# Allegro board Greybull_osp.brd

Outline 288 x 245 mm; copper layers: TOP, LYR2, LYR3, LYR4, LYR5, BOTTOM. Coordinates in mm from the lower left corner of the outline.
Outline path: 0,170.46 0,6 arc(1.76,1.76) 6,0 282,0 arc(286.24,1.76) 288,6 288,239 arc(286.24,243.24) 282,245 63.48,245 arc(61.43,244.64) 59.63,243.6 48.67,234.4 arc(46.87,233.36) 44.82,233 14,233 arc(6.93,230.07) 4,223 4,180.61 arc(3.8,179.05) 3.2,177.61 0.8,173.46 arc(0.2,172.02) 0,170.46

## Design rules (mm)
constraint set DEFAULT: min track width 0.102
net group 250M_BYPASS: nets 250M_CLK_BYPASS_DN 250M_CLK_BYPASS_DP
net group AV_SOC_100M_CLK: nets SOC_AV_NS_100M_CLKN SOC_AV_NS_100M_CLKP
net group BINDSW_N: nets BINDSW_N BINDSW_N_R
net group BKUP_SB_AV_CLK: nets BKUP_SB_AV_CLKN BKUP_SB_AV_CLKP
net group BKUP_SB_PEX_REF_CLK: nets BKUP_SB_PEX_REF_CLKN BKUP_SB_PEX_REF_CLKP
net group BKUP_SB_SYNC_CLK: nets BKUP_SB_SYNC_CLKN BKUP_SB_SYNC_CLKP
net group BLEEDER_V12P0_B2: nets BLEEDER_V12P0_B2 BLEEDER_V12P0_C2
net group CRYSTAL-DIFFPAIR1: nets SMC_XTAL_IN SMC_XTAL_OUT_R
net group DDA_LFC: nets DDA_LFC DDA_LFCSENSE
net group DP1-USB3-FP-P-T-CM: nets USB3_FP_P0_TN_CMC USB3_FP_P0_TP_CMC
net group DP1_USB3_AUX_T_CM: nets USB3_AUX_TN_CMC USB3_AUX_TP_CMC
net group DP2_USB3_FP_P0_RN_C: nets USB3_FP_P0_RN USB3_FP_P0_RP
net group DP_BKUP_ENET_PEX_REF_CLKN_R: nets ENET_PEX_SS_100M_CLKN ENET_PEX_SS_100M_CLKP
net group DP_L0_SB_SOC_TN: nets DP_L0_SB_SOC_TN DP_L0_SB_SOC_TN_C
net group DP_L0_SB_SOC_TP: nets DP_L0_SB_SOC_TP DP_L0_SB_SOC_TP_C
net group DP_L1_SB_SOC_TN: nets DP_L1_SB_SOC_TN DP_L1_SB_SOC_TN_C
net group DP_L1_SB_SOC_TP: nets DP_L1_SB_SOC_TP DP_L1_SB_SOC_TP_C
net group DP_USB3_AUX_R_C: nets USB3_AUX_RN USB3_AUX_RP
net group DP_USB3_TP_P0_RN_C: nets USB3_TP_P1_RN USB3_TP_P1_RP
net group ENET_EEDO: nets ENET_EEDO ENET_LED3
net group ENET_EESK: nets ENET_EESK ENET_LED1
net group ENET_LED0: nets ENET_LED0 ENET_LED0_R
net group FAN_PWM: nets FAN_PWM FAN_PWM_R
net group FTDI_SMC_CTS: nets FTDI_SMC_CTS SMC_CTS
net group FTDI_SMC_RTS: nets FTDI_SMC_RTS SMC_RTS
net group HDD_PWR_EN: nets HDD_PWR_EN HDD_PWR_EN_R
net group HDMI_DP_OUT_SEL: nets HDMI_DP_OUT_SEL SMM_GPIO1
net group HDMI_HPD_PIN: nets HDMI_HPD_PIN HDMI_RX_HPD
net group HDMI_RX_TEST: nets HDMI_RX_TESTN HMDI_RX_TESTP
net group HDMI_TX_HPD_G: nets HDMI_TX_HPD_G HDMI_TX_HPD_PIN
net group HDT_TRST: nets HDT_TRST TRST_L
net group IR_BLAST_E1: nets IR_BLAST_E1 IR_BLAST_G2
net group IR_BLAST_EN: nets IR_BLAST_EN SMC_P1_GPIO1
net group IR_BLAST_SLEEVE: nets IR_BLAST_SLEEVE IR_BLAST_TIP
net group IR_BLAST_XIN: nets IR_BLAST_XIN IR_BLAST_XOUT
net group KER_DBG_RTS: nets KER_DBG_RTS KER_DBG_RTS_FACET
net group KER_DBG_TXD: nets KER_DBG_TXD KER_DBG_TXD_FACET
net group KIC3P3HDMI_B: nets KIC3P3HDMI_B KIC3P3HDMI_G
net group MA_VREFDQ: nets MA_VREFDQ MA_VREFDQ_MM
net group MB_VREFDQ: nets MB_VREFDQ MB_VREFDQ_MM
net group MC_VREFDQ: nets MC_VREFDQ MC_VREFDQ_MM
net group MD_VREFDQ: nets MD_VREFDQ MD_VREFDQ_MM
net group MMC_CLK: nets MMC_CLK MMC_CLK_R
net group MMC_CMD: nets MMC_CMD MMC_CMD_R
net group MMC_DATA<0>: nets MMC_DATA<0> MMC_DATA_R<0>
net group MMC_DATA<1>: nets MMC_DATA<1> MMC_DATA_R<1>
net group MMC_DATA<2>: nets MMC_DATA<2> MMC_DATA_R<2>
net group MMC_DATA<3>: nets MMC_DATA<3> MMC_DATA_R<3>
net group MMC_DATA<4>: nets MMC_DATA<4> MMC_DATA_R<4>
net group MMC_DATA<5>: nets MMC_DATA<5> MMC_DATA_R<5>
net group MMC_DATA<6>: nets MMC_DATA<6> MMC_DATA_R<6>
net group MMC_DATA<7>: nets MMC_DATA<7> MMC_DATA_R<7>
net group MMC_RST_N: nets MMC_RST_N MMC_RST_N_R
net group ODD_PWR_EN: nets ODD_PWR_EN ODD_PWR_EN_R
net group ODD_STATUS: nets ODD_STATUS ODD_STATUS_R
net group PEX-SOC-M1: nets PEX_SOC_SPARE_TN PEX_SOC_SPARE_TP
net group PEX-SPARE-M1: nets PEX_SPARE_SOC_TN_C PEX_SPARE_SOC_TP_C
net group PEX_ENET_SOC_TN: nets PEX_ENET_SOC_TN PEX_ENET_SOC_TN_C
net group PEX_ENET_SOC_TP: nets PEX_ENET_SOC_TP PEX_ENET_SOC_TP_C
net group PEX_L0_SB_SOC_TN: nets PEX_L0_SB_SOC_TN PEX_L0_SB_SOC_TN_C
net group PEX_L0_SB_SOC_TP: nets PEX_L0_SB_SOC_TP PEX_L0_SB_SOC_TP_C
net group PEX_L0_SOC_SB_TN: nets PEX_L0_SOC_SB_TN PEX_L0_SOC_SB_TN_C
net group PEX_L0_SOC_SB_TP: nets PEX_L0_SOC_SB_TP PEX_L0_SOC_SB_TP_C
net group PEX_L1_SB_SOC_TN: nets PEX_L1_SB_SOC_TN PEX_L1_SB_SOC_TN_C
net group PEX_L1_SB_SOC_TP: nets PEX_L1_SB_SOC_TP PEX_L1_SB_SOC_TP_C
net group PEX_L1_SOC_SB_TN: nets PEX_L1_SOC_SB_TN PEX_L1_SOC_SB_TN_C
net group PEX_L1_SOC_SB_TP: nets PEX_L1_SOC_SB_TP PEX_L1_SOC_SB_TP_C
net group PEX_SOC_100M_CLK: nets SOC_PEX_SS_100M_CLKN SOC_PEX_SS_100M_CLKP
net group PEX_SOC_ENET_TN: nets PEX_SOC_ENET_TN PEX_SOC_ENET_TN_C
net group PEX_SOC_ENET_TP: nets PEX_SOC_ENET_TP PEX_SOC_ENET_TP_C
net group PEX_XTAL1: nets PEX_XTAL1 PEX_XTAL_1_R
net group SATA0_ODD_RN: nets SATA0_ODD_RN SATA0_ODD_RN_C
net group SATA0_ODD_RP: nets SATA0_ODD_RP SATA0_ODD_RP_C
net group SATA0_ODD_TN: nets SATA0_ODD_TN SATA0_ODD_TN_C
net group SATA0_ODD_TP: nets SATA0_ODD_TP SATA0_ODD_TP_C
net group SATA1_HDD_RN: nets SATA1_HDD_RN SATA1_HDD_RN_C
net group SATA1_HDD_RP: nets SATA1_HDD_RP SATA1_HDD_RP_C
net group SATA1_HDD_TN: nets SATA1_HDD_TN SATA1_HDD_TN_C
net group SATA1_HDD_TP: nets SATA1_HDD_TP SATA1_HDD_TP_C
net group SB_TDO: nets SB_TDO SB_TDO_FACET
net group SMC_BYPASS: nets TEST25_N TEST25_P
net group SMC_DBG_LED0_SWO: nets SMC_DBG_LED0_SWO SMC_DBG_LED0_SWO_FACET
net group SMC_P1_GPIO2: nets SMC_P1_GPIO2 USB_AUX_EN
net group SOC_NB_PEX_SS_100M_CLK: nets SOC_NB_PEX_SS_100M_CLKN SOC_NB_PEX_SS_100M_CLKP
net group SOC_PWR_OK: nets SOC_PWR_OK SOC_PWR_OK_R
net group SOC_REF_NS_100M_CLK: nets SOC_REF_NS_100M_CLKN SOC_REF_NS_100M_CLKP
net group SOC_RESET_N_R: nets SOC_RESET_N_R SOC_RST_N
net group SOC_THERMTRIP: nets SOC_THERMTRIP SOC_THERMTRIP_R
net group SP_SMC_INT_N: nets SP_SMC_INT_N SP_SMC_INT_N_R
net group SVC: nets SVC SVC_R
net group SVD: nets SVD SVD_R
net group SVT: nets SVT SVT_R
net group TMDS_TX_CLKN: nets TMDS_TX_CLKN TMDS_TX_CLKN_C
net group TMDS_TX_CLKP: nets TMDS_TX_CLKP TMDS_TX_CLKP_C
net group TMDS_TX_DN0: nets TMDS_TX_DN0 TMDS_TX_DN0_C
net group TMDS_TX_DN1: nets TMDS_TX_DN1 TMDS_TX_DN1_C
net group TMDS_TX_DN2: nets TMDS_TX_DN2 TMDS_TX_DN2_C
net group TMDS_TX_DP0: nets TMDS_TX_DP0 TMDS_TX_DP0_C
net group TMDS_TX_DP1: nets TMDS_TX_DP1 TMDS_TX_DP1_C
net group TMDS_TX_DP2: nets TMDS_TX_DP2 TMDS_TX_DP2_C
net group USB2-TX-RX-M1: nets USB2_BP_P1_DN USB2_BP_P1_DP
net group USB2_ACC: nets USB2_ACC_DN USB2_ACC_DP
net group USB2_AUX: nets USB2_AUX_DN USB2_AUX_DP
net group USB2_WIFI: nets USB2_WIFI_DN USB2_WIFI_DP
net group USB3-TX-RX-M1: nets USB2_BP_P0_DN USB2_BP_P0_DP
net group USB3_AUX_TN: nets USB3_AUX_TN USB3_AUX_TN_C
net group USB3_AUX_TP: nets USB3_AUX_TP USB3_AUX_TP_C
net group USB3_BP_P0_TN: nets USB3_BP_P0_TN USB3_BP_P0_TN_C
net group USB3_BP_P0_TP: nets USB3_BP_P0_TP USB3_BP_P0_TP_C
net group USB3_BP_P1_TN: nets USB3_BP_P1_TN USB3_BP_P1_TN_C
net group USB3_BP_P1_TP: nets USB3_BP_P1_TP USB3_BP_P1_TP_C
net group USB3_FP_P0_TN: nets USB3_FP_P0_TN USB3_FP_P0_TN_C
net group USB3_FP_P0_TP: nets USB3_FP_P0_TP USB3_FP_P0_TP_C
net group USB3_TP_P1_TN: nets USB3_TP_P1_TN USB3_TP_P1_TN_C
net group USB3_TP_P1_TP: nets USB3_TP_P1_TP USB3_TP_P1_TP_C
net group USB_AUX_EN_D: nets USB_AUX_EN_D USB_AUX_OCP_EN_N
net group VREG_3P3STBY_IN_SEL_C: nets VREG_3P3STBY_IN_SEL_C VREG_3P3STBY_IN_SEL_PGATE
net group VREG_BURN_EN: nets VREG_BURN_EN VREG_BURN_EN_R
net group VREG_BURN_OUT_CGD: nets VREG_BURN_OUT_CGD VREG_BURN_OUT_G
net group VREG_MEMCORE_VID0: nets VREG_MEMCORE_VID0 VREG_MEMCORE_VID0_R
net group VREG_MEMCORE_VID1: nets VREG_MEMCORE_VID1 VREG_MEMCORE_VID1_R
net group VREG_V3P3_FB: nets VREG_V3P3_FB VREG_V3P3_VO
net group VREG_VTTA_VO: nets VREG_VTTA_VO VREG_VTTA_VO_R
net group VREG_VTTB_VO: nets VREG_VTTB_VO VREG_VTTB_VO_R
net group VREG_VTTC_VO: nets VREG_VTTC_VO VREG_VTTC_VO_R
net group VREG_VTTD_VO: nets VREG_VTTD_VO VREG_VTTD_VO_R
net group BLEEDER_B: nets BLEEDER_B SMC_RST_N SMC_RST_N_FACET SMC_RST_N_OUT_R
net group BLEEDER_V12P0_B1: nets BLEEDER_V12P0_B1 PSU_V12P0_EN PSU_V12P0_EN_R V12P0_PWRGD
net group DP_AUX_SB_SOC_TN: nets DP_AUX_SB_SOC_TN DP_AUX_SB_SOC_TN_C DP_AUX_SOC_SB_TN
net group DP_AUX_SB_SOC_TP: nets DP_AUX_SB_SOC_TP DP_AUX_SB_SOC_TP_C DP_AUX_SOC_SB_TP
net group EJECTSW_N: nets EJECTSW_N EJECTSW_N_R EJECTSW_N_SW
net group ENET-DIFFPAIR-M1: nets MDIN0 MDIN1 MDIN2 MDIN3 MDIP0 MDIP1 MDIP2 MDIP3
net group ENET_REF_CLK: nets ENET_REF_CLK PEX_XTAL2 PEX_XTAL_2_R
net group FAN_TACH_IN: nets FAN_TACH_IN FAN_TACH_IN_R SMM_GPIO0
net group HDMI-RX-D-DIFFPAIR-M1: nets TMDS_RX_CLKN TMDS_RX_DN0 TMDS_RX_DN1 TMDS_RX_DN2 TMDS_RX_DP0 TMDS_RX_DP1 TMDS_RX_DP2
net group HDMI_OUT_DDC_BUFF_CLK: nets HDMI_OUT_DDC_BUFF_CLK HDMI_OUT_DDC_CLK HDMI_OUT_DDC_CLK_R HDMI_TX_DDC_CLK HDMI_TX_DDC_CLK_SB
net group HDMI_OUT_DDC_BUFF_DATA: nets HDMI_OUT_DDC_BUFF_DATA HDMI_OUT_DDC_DATA HDMI_OUT_DDC_DATA_R HDMI_TX_DDC_DATA HDMI_TX_DDC_DATA_SB
net group HDMI_RX_CEC: nets HDMI_RX_CEC HDMI_RX_CEC_3P3 HDMI_RX_CEC_R HDMI_TX_CEC
net group HDMI_RX_DDC_5V: nets HDMI_RX_DDC_5V HDMI_RX_DDC_5V_G HDMI_RX_DDC_CLK HDMI_RX_DDC_CLK_SB HDMI_RX_DDC_DATA HDMI_RX_DDC_DATA_SB
net group HDMI_RX_DDC_5V_D: nets HDMI_RX_DDC_5V_D HDMI_RX_DDC_5V_E HDMI_RX_DDC_5V_E_R
net group IR_BLAST_G1: nets IR_BLAST_G1 IR_BLAST_LED IR_BLAST_OR_OUT IR_BLAST_P0_6 IR_BLAST_P0_7 IR_BLAST_P3_1_IN IR_BLAST_P3_1_OUT IR_BLAST_P3_1_R IR_BLAST_RXD IR_BLAST_SENSOR_SIG IR_BLAST_SMC_OUT_C SMC_TXD V_3P3STBY_IR
net group IR_BLAST_P1_5: nets IR_BLAST_P1_5 IR_BLAST_TXD SMC_RXD
net group IR_BLAST_SMC_OUT: nets IR_BLAST_SMC_OUT IR_BLAST_SMC_OUT_B SMC_P3_GPIO7
net group KIC3P3HDMI_C: nets KIC3P3HDMI_C
net group MA_A: nets MA_A<0> MA_A<1> MA_A<2> MA_A<3> MA_A<4> MA_A<5> MA_A<6> MA_A<7> MA_A<8> MA_A<9> MA_A<10> MA_A<11> MA_A<12> MA_A<13> MA_A<14> MA_A<15>
net group MA_BA: nets MA_BA<0> MA_BA<1> MA_BA<2>
net group MB_A: nets MB_A<0> MB_A<1> MB_A<2> MB_A<3> MB_A<4> MB_A<5> MB_A<6> MB_A<7> MB_A<8> MB_A<9> MB_A<10> MB_A<11> MB_A<12> MB_A<13> MB_A<14> MB_A<15>
net group MB_BA: nets MB_BA<0> MB_BA<1> MB_BA<2>
net group MC_A: nets MC_A<0> MC_A<1> MC_A<2> MC_A<3> MC_A<4> MC_A<5> MC_A<6> MC_A<7> MC_A<8> MC_A<9> MC_A<10> MC_A<11> MC_A<12> MC_A<13> MC_A<14> MC_A<15>
net group MC_BA: nets MC_BA<0> MC_BA<1> MC_BA<2>
net group MD_A: nets MD_A<0> MD_A<1> MD_A<2> MD_A<3> MD_A<4> MD_A<5> MD_A<6> MD_A<7> MD_A<8> MD_A<9> MD_A<10> MD_A<11> MD_A<12> MD_A<13> MD_A<14> MD_A<15>
net group MD_BA: nets MD_BA<0> MD_BA<1> MD_BA<2>
net group MEM-A-ADDR-CLK2STROBE-M1: nets MD_DQSL_0_P MD_DQSL_1_P MD_DQSL_2_P MD_DQSL_3_P MD_DQSU_0_P MD_DQSU_1_P MD_DQSU_2_P MD_DQSU_3_P
net group MEM-B-ADDR-CLK2STROBE-M1: nets MC_DQSL_0_P MC_DQSL_1_P MC_DQSL_2_P MC_DQSL_3_P MC_DQSU_0_P MC_DQSU_1_P MC_DQSU_2_P MC_DQSU_3_P
net group MEM-C-ADDR-CLK2STROBE-M1: nets MB_DQSL_0_P MB_DQSL_1_P MB_DQSL_2_P MB_DQSL_3_P MB_DQSU_0_P MB_DQSU_1_P MB_DQSU_2_P MB_DQSU_3_P
net group MEM-D-ADDR-CLK2STROBE-M1: nets MA_DQSL_0_P MA_DQSL_1_P MA_DQSL_2_P MA_DQSL_3_P MA_DQSU_0_P MA_DQSU_1_P MA_DQSU_2_P MA_DQSU_3_P
net group MEM-DATA-A_0-7-M1: nets MD_DML_0 MD_DQ0 MD_DQ1 MD_DQ2 MD_DQ3 MD_DQ4 MD_DQ5 MD_DQ6 MD_DQ7 MD_DQSL_0_N
net group MEM-DATA-A_8-15-M1: nets MD_DMU_0 MD_DQ8 MD_DQ9 MD_DQ10 MD_DQ11 MD_DQ12 MD_DQ13 MD_DQ14 MD_DQ15 MD_DQSU_0_N
net group MEM-DATA-A_16-23-M1: nets MD_DML_1 MD_DQ16 MD_DQ17 MD_DQ18 MD_DQ19 MD_DQ20 MD_DQ21 MD_DQ22 MD_DQ23 MD_DQSL_1_N
net group MEM-DATA-A_24-31-M1: nets MD_DMU_1 MD_DQ24 MD_DQ25 MD_DQ26 MD_DQ27 MD_DQ28 MD_DQ29 MD_DQ30 MD_DQ31 MD_DQSU_1_N
net group MEM-DATA-A_32-39-M1: nets MD_DML_2 MD_DQ32 MD_DQ33 MD_DQ34 MD_DQ35 MD_DQ36 MD_DQ37 MD_DQ38 MD_DQ39 MD_DQSL_2_N
net group MEM-DATA-A_40-47-M1: nets MD_DMU_2 MD_DQ40 MD_DQ41 MD_DQ42 MD_DQ43 MD_DQ44 MD_DQ45 MD_DQ46 MD_DQ47 MD_DQSU_2_N
net group MEM-DATA-A_48-55-M1: nets MD_DML_3 MD_DQ48 MD_DQ49 MD_DQ50 MD_DQ51 MD_DQ52 MD_DQ53 MD_DQ54 MD_DQ55 MD_DQSL_3_N
net group MEM-DATA-A_56-63-M1: nets MD_DMU_3 MD_DQ56 MD_DQ57 MD_DQ58 MD_DQ59 MD_DQ60 MD_DQ61 MD_DQ62 MD_DQ63 MD_DQSU_3_N
net group MEM-DATA-B_0-7-M1: nets MC_DML_0 MC_DQ0 MC_DQ1 MC_DQ2 MC_DQ3 MC_DQ4 MC_DQ5 MC_DQ6 MC_DQ7 MC_DQSL_0_N
net group MEM-DATA-B_8-15-M1: nets MC_DMU_0 MC_DQ8 MC_DQ9 MC_DQ10 MC_DQ11 MC_DQ12 MC_DQ13 MC_DQ14 MC_DQ15 MC_DQSU_0_N
net group MEM-DATA-B_16-23-M1: nets MC_DML_1 MC_DQ16 MC_DQ17 MC_DQ18 MC_DQ19 MC_DQ20 MC_DQ21 MC_DQ22 MC_DQ23 MC_DQSL_1_N
net group MEM-DATA-B_24-31-M1: nets MC_DMU_1 MC_DQ24 MC_DQ25 MC_DQ26 MC_DQ27 MC_DQ28 MC_DQ29 MC_DQ30 MC_DQ31 MC_DQSU_1_N
net group MEM-DATA-B_32-39-M1: nets MC_DML_2 MC_DQ32 MC_DQ33 MC_DQ34 MC_DQ35 MC_DQ36 MC_DQ37 MC_DQ38 MC_DQ39 MC_DQSL_2_N
net group MEM-DATA-B_40-47-M1: nets MC_DMU_2 MC_DQ40 MC_DQ41 MC_DQ42 MC_DQ43 MC_DQ44 MC_DQ45 MC_DQ46 MC_DQ47 MC_DQSU_2_N
net group MEM-DATA-B_48-55-M1: nets MC_DML_3 MC_DQ48 MC_DQ49 MC_DQ50 MC_DQ51 MC_DQ52 MC_DQ53 MC_DQ54 MC_DQ55 MC_DQSL_3_N
net group MEM-DATA-B_56-63-M1: nets MC_DMU_3 MC_DQ56 MC_DQ57 MC_DQ58 MC_DQ59 MC_DQ60 MC_DQ61 MC_DQ62 MC_DQ63 MC_DQSU_3_N
net group MEM-DATA-C_0-7-M1: nets MB_DML_0 MB_DQ0 MB_DQ1 MB_DQ2 MB_DQ3 MB_DQ4 MB_DQ5 MB_DQ6 MB_DQ7 MB_DQSL_0_N
net group MEM-DATA-C_8-15-M1: nets MB_DMU_0 MB_DQ8 MB_DQ9 MB_DQ10 MB_DQ11 MB_DQ12 MB_DQ13 MB_DQ14 MB_DQ15 MB_DQSU_0_N
net group MEM-DATA-C_16-23-M1: nets MB_DML_1 MB_DQ16 MB_DQ17 MB_DQ18 MB_DQ19 MB_DQ20 MB_DQ21 MB_DQ22 MB_DQ23 MB_DQSL_1_N
net group MEM-DATA-C_24-31-M1: nets MB_DMU_1 MB_DQ24 MB_DQ25 MB_DQ26 MB_DQ27 MB_DQ28 MB_DQ29 MB_DQ30 MB_DQ31
net group MEM-DATA-C_32-39-M1: nets MB_DML_2 MB_DQ32 MB_DQ33 MB_DQ34 MB_DQ35 MB_DQ36 MB_DQ37 MB_DQ38 MB_DQ39 MB_DQSL_2_N
net group MEM-DATA-C_40-47-M1: nets MB_DMU_2 MB_DQ40 MB_DQ41 MB_DQ42 MB_DQ43 MB_DQ44 MB_DQ45 MB_DQ46 MB_DQ47 MB_DQSU_2_N
net group MEM-DATA-C_48-55-M1: nets MB_DML_3 MB_DQ48 MB_DQ49 MB_DQ50 MB_DQ51 MB_DQ52 MB_DQ53 MB_DQ54 MB_DQ55 MB_DQSL_3_N
net group MEM-DATA-C_56-63-M1: nets MB_DMU_3 MB_DQ56 MB_DQ57 MB_DQ58 MB_DQ59 MB_DQ60 MB_DQ61 MB_DQ62 MB_DQ63 MB_DQSU_3_N
net group MEM-DATA-D_0-7-M1: nets MA_DML_0 MA_DQ0 MA_DQ1 MA_DQ2 MA_DQ3 MA_DQ4 MA_DQ5 MA_DQ6 MA_DQ7 MA_DQSL_0_N
net group MEM-DATA-D_8-15-M1: nets MA_DMU_0 MA_DQ8 MA_DQ9 MA_DQ10 MA_DQ11 MA_DQ12 MA_DQ13 MA_DQ14 MA_DQ15 MA_DQSU_0_N
net group MEM-DATA-D_16-23-M1: nets MA_DML_1 MA_DQ16 MA_DQ17 MA_DQ18 MA_DQ19 MA_DQ20 MA_DQ21 MA_DQ22 MA_DQ23 MA_DQSL_1_N
net group MEM-DATA-D_24-31-M1: nets MA_DMU_1 MA_DQ24 MA_DQ25 MA_DQ26 MA_DQ27 MA_DQ28 MA_DQ29 MA_DQ30 MA_DQ31 MA_DQSU_1_N
net group MEM-DATA-D_32-39-M1: nets MA_DML_2 MA_DQ32 MA_DQ33 MA_DQ34 MA_DQ35 MA_DQ36 MA_DQ37 MA_DQ38 MA_DQ39 MA_DQSL_2_N
net group MEM-DATA-D_40-47-M1: nets MA_DMU_2 MA_DQ40 MA_DQ41 MA_DQ42 MA_DQ43 MA_DQ44 MA_DQ45 MA_DQ46 MA_DQ47 MA_DQSU_2_N
net group MEM-DATA-D_48-55-M1: nets MA_DML_3 MA_DQ48 MA_DQ49 MA_DQ50 MA_DQ51 MA_DQ52 MA_DQ53 MA_DQ54 MA_DQ55 MA_DQSL_3_N
net group MEM-DATA-D_56-63-M1: nets MA_DMU_3 MA_DQ56 MA_DQ57 MA_DQ58 MA_DQ59 MA_DQ60 MA_DQ61 MA_DQ62 MA_DQ63 MA_DQSU_3_N
net group MEM_A_ADDR: nets MD_CKE0 MD_CS0_N MD_ODT0 MD_RESET_N
net group PWRSW_N: nets PWRSW_N PWRSW_N_R PWRSW_N_SW
net group RTC_CLK_OUT: nets RTC_CLK_OUT X32K_X1 X32K_X1_R X32K_X2
net group SB_SOC_CLK: nets SB_SOC_CLK SB_SOC_CLK_R SIC
net group SB_SOC_DATA: nets SB_SOC_DATA SB_SOC_DATA_R SID
net group SMBUS_CLK: nets SMBUS_CLK SMBUS_CLK_CPUCORE SMBUS_CLK_FACET SMBUS_CLK_R
net group SMBUS_DATA: nets SMBUS_DATA SMBUS_DATA_CPUCORE SMBUS_DATA_FACET SMBUS_DATA_R
net group SPI_MISO: nets SPI_MISO SPI_MISO_FACET SPI_MISO_R
net group TMDS_RX_CLK: nets TMDS_RX_CLKP
net group USB3-AUX2-M1: nets USB3_BP_P0_RN USB3_BP_P0_RP USB3_BP_P1_RN USB3_BP_P1_RP
net group USB3-BP-CM-M1: nets USB3_BP_P0_TN_CMC USB3_BP_P0_TP_CMC USB3_BP_P1_TN_CMC USB3_BP_P1_TP_CMC
net group VREG_1P1STBY_AGND: nets VREG_1P1STBY_AGND VREG_1P1STBY_COMP VREG_1P1STBY_COMP_C VREG_1P1STBY_FB VREG_1P1STBY_FB_TOP
net group VREG_1P1STBY_PWRGD: nets VREG_1P1STBY_PWRGD VREG_1P8STBY_EN VREG_1P8STBY_IN VREG_1P8STBY_IN_D1 VREG_1P8STBY_IN_D2 VREG_1P8STBY_IN_D3
net group VREG_3P3STBY_AGND: nets VREG_3P3STBY_AGND VREG_3P3STBY_COMP VREG_3P3STBY_COMP_C VREG_3P3STBY_FB VREG_3P3STBY_FB_TOP
net group VREG_3P3STBY_EN: nets V_VREG_STBY_VIN_CR VREG_3P3STBY_EN VREG_3P3STBY_PWRGD
net group VREG_3P3STBY_IN_SEL: nets VREG_3P3STBY_IN_SEL VREG_3P3STBY_IN_SEL_B1 VREG_3P3STBY_IN_SEL_B2
net group VREG_5P0_ADDR: nets VREG_5P0_ADDR VREG_5P0_LDO5 VREG_V5P0_PWRGD
net group VREG_CPUCORE_COMP: nets VREG_CPUCORE_COMP VREG_CPUCORE_COMP_R VREG_CPUCORE_DIFFOUT VREG_CPUCORE_FB VREG_CPUCORE_FB_C VREG_CPUCORE_TRBST VREG_CPUCORE_TRBST_R VREG_VDD_TRBST_C
net group VREG_CPUCORE_CSCOMP: nets VREG_CPUCORE_CSCOMP VREG_CPUCORE_CSCOMP_R VREG_CPUCORE_CSN VREG_CPUCORE_CSN_R VREG_CPUCORE_CSP VREG_CPUCORE_CSSUM VREG_CPUCORE_DROOP VREG_CPUCORE_ILIM VREG_CPUCORE_SW_S
net group VREG_CPUCORE_PH_EN: nets VREG_CPUCORE_PH_EN VREG_GFXCORE_PH1_EN VREG_GFXCORE_PH2_EN VREG_GFXCORE_PH3_EN VREG_GFXCORE_PH4_EN VREG_GFXCPU_DRV_EN
net group VREG_GFXCORE_COMP: nets VREG_GFXCORE_COMP VREG_GFXCORE_COMP_R VREG_GFXCORE_DIFFOUT VREG_GFXCORE_FB VREG_GFXCORE_FB_C VREG_GFXCORE_TRBST VREG_GFXCORE_TRBST_C VREG_GFXCORE_TRBST_R
net group VREG_GFXCORE_CSCOMP: nets VREG_GFXCORE_CSCOMP VREG_GFXCORE_CSCOMP_R VREG_GFXCORE_CSSUM VREG_GFXCORE_DROOP VREG_GFXCORE_ILIM
net group VREG_GFXCORE_CSN1: nets VREG_GFXCORE_CSN1 VREG_GFXCORE_CSN2 VREG_GFXCORE_CSN3 VREG_GFXCORE_CSN4 VREG_GFXCORE_CSP1 VREG_GFXCORE_CSP2 VREG_GFXCORE_CSP3 VREG_GFXCORE_CSP4 VREG_GFXCORE_CSREF
net group VREG_MEMCORE_COMP: nets VREG_MEMCORE_COMP VREG_MEMCORE_FB VREG_MEMCORE_FB_R VREG_MEMCORE_RNT_R VREG_MEMCORE_S
net group VREG_MEMCORE_CSN: nets VREG_MEMCORE_CSN VREG_MEMCORE_CSP VREG_MEMCORE_SW_S
net group VREG_MEMCORE_RTN: nets VREG_MEMCORE_RTN VREG_MEMCORE_SET0 VREG_MEMCORE_SET1 VREG_MEMCORE_SET2 VREG_MEMCORE_SS
net group VREG_MEMIOAB_FB: nets VREG_MEMIOAB_FB VREG_MEMIOAB_FB_R_GND VREG_MEMIOAB_VO
net group VREG_MEMIOCD_FB: nets VREG_MEMIOCD_FB VREG_MEMIOCD_FB_R_GND VREG_MEMIOCD_VO
net group VREG_NBCORE_FB: nets VREG_NBCORE_FB VREG_NBCORE_VO VREG_NPCORE_FB_R_GND
net group VREG_SB1P1_EN: nets V_SB2P5 VREG_SB1P1_EN VREG_SB1P8_EN
net group VREG_SB2P5_COMP_C: nets VREG_SB2P5_COMP_C VREG_SB2P5_FB VREG_SB2P5_TOP
net group VREG_SOCPHY_COMP_C: nets VREG_SOCPHY_COMP_C VREG_SOCPHY_FB VREG_SOCPHY_FB_TOP
net group VREG_V5P0_DUAL_SEL0: nets VREG_V5P0_DUAL_SEL0 VREG_V5P0_SEL_B1 VREG_V5P0_SEL_B2
net group VREG_V5P0DUAL_CDG: nets VREG_V5P0_SEL_C VREG_V5P0_SEL_PGATE VREG_V5P0DUAL_CDG
net group ZQ: nets MA_ZQ0 MA_ZQ1 MA_ZQ2 MA_ZQ3 MB_ZQ0 MB_ZQ1 MB_ZQ2 MB_ZQ3 MC_ZQ0 MC_ZQ1 MC_ZQ2 MC_ZQ3 MD_ZQ0 MD_ZQ1 MD_ZQ2 MD_ZQ3
net group ZVDDIO: nets MA_ZVDDIO MB_ZVDDIO MC_ZVDDIO MD_ZVDDIO

## Placement (name value [footprint] x y rotation side)
C1N1  -  [CAP_0402_CO]  247.32 220.65 270 bottom
C1N2  -  [CAP_0603_CO]  264.46 216.46 90 bottom
C1N3  -  [CAP_0603_CO]  262.94 216.46 90 bottom
C1N4  -  [CAP_0603_CO]  261.41 216.46 90 bottom
C1N5  -  [CAP_0603_CO]  259.89 216.46 90 bottom
C1P3  -  [CAP_0402_CO]  278.05 166.8 270 bottom
C1P4  -  [CAP_0402_CO]  279.45 165.53 90 bottom
C1P5  -  [CAP_0402_CO]  256.62 165.14 90 bottom
C1P6  -  [CAP_0402_CO]  278.05 164.26 270 bottom
C1P7  -  [CAP_0603_CO]  270.05 162.35 0 bottom
C1P8  -  [CAP_0402_CO]  277.67 161.72 270 bottom
C1P9  -  [CAP_0402_CO]  263.7 158.8 270 bottom
C1P10  -  [CAP_0402_CO]  276.02 158.42 270 bottom
C1P11  -  [CAP_0402_CO]  247.2 157.98 90 bottom
C1P12  -  [CAP_0402_CO]  254.56 157.34 90 bottom
C1P13  -  [CAP_0402_CO]  256.21 157.34 270 bottom
C1P14  -  [CAP_0402_CO]  258.37 156.71 270 bottom
C1P15  -  [CAP_0402_CO]  276.78 156.64 0 bottom
C1P16  -  [CAP_0402_CO]  247.2 155.56 270 bottom
C1P17  -  [CAP_0402_CO]  248.97 155.56 90 bottom
C1P18  -  [CAP_0402_CO]  254.56 154.8 90 bottom
C1P19  -  [CAP_0402_CO]  250.62 152.83 180 bottom
C1R1  -  [CAP_0805_CO]  276.27 141.65 0 bottom
C1R2  -  [CAP_0805_CO]  276.27 139.11 0 bottom
C1R3  -  [CAP_0805_CO]  276.27 127.68 0 bottom
C1R4  -  [CAP_0805_CO]  276.27 125.27 0 bottom
C1R5  -  [CAP_0805_CO]  276.27 113.71 0 bottom
C1R6  -  [CAP_0805_CO]  276.27 111.17 0 bottom
C1T1  -  [CAP_0805_CO]  276.27 99.74 0 bottom
C1T2  -  [CAP_0805_CO]  276.27 97.2 0 bottom
C1T3  -  [CAP_0805_CO]  276.27 85.77 0 bottom
C1T4  -  [CAP_0805_CO]  276.27 83.23 0 bottom
C1U2  -  [CAP_0805_CO]  279.32 51.1 270 bottom
C1U3  -  [CAP_0805_CO]  281.23 51.1 270 bottom
C1U4  -  [CAP_0402_CO]  251.51 39.92 90 bottom
C1U5  -  [CAP_0402_CO]  248.97 37.2 270 bottom
C1U6  -  [CAP_0402_CO]  254.56 36.44 270 bottom
C1U7  -  [CAP_0402_CO]  256.34 36.44 90 bottom
C1U8  -  [CAP_0402_CO]  247.32 34.66 90 bottom
C1U9  -  [CAP_0402_CO]  248.97 34.66 270 bottom
C1U10  -  [CAP_0402_CO]  256.34 34.02 270 bottom
C1U11  -  [CAP_0402_CO]  247.07 26.91 270 bottom
C1U12  -  [CAP_0402_CO]  256.85 26.28 0 bottom
C2N1  -  [CAP_0402_CO]  229.41 224.2 270 bottom
C2P3  -  [CAP_0402_CO]  246.55 165.4 180 bottom
C2P4  -  [CAP_0402_CO]  231.62 165.35 180 bottom
C2P5  -  [CAP_0402_CO]  216.21 165.34 180 bottom
C2P6  -  [CAP_0402_CO]  210.75 165.09 90 bottom
C2P7  -  [CAP_0402_CO]  225.99 165.09 90 bottom
C2P8  -  [CAP_0402_CO]  241.38 164.63 90 bottom
C2P9  -  [CAP_0402_CO]  233.6 157.98 90 bottom
C2P10  -  [CAP_0402_CO]  218.35 157.98 90 bottom
C2P11  -  [CAP_0402_CO]  239.34 157.48 90 bottom
C2P12  -  [CAP_0402_CO]  208.84 157.47 90 bottom
C2P13  -  [CAP_0402_CO]  224.08 157.47 90 bottom
C2P14  -  [CAP_0402_CO]  212.65 156.71 270 bottom
C2P15  -  [CAP_0402_CO]  227.89 156.71 270 bottom
C2P16  -  [CAP_0402_CO]  243.13 156.71 270 bottom
C2P17  -  [CAP_0402_CO]  220.14 155.95 90 bottom
C2P18  -  [CAP_0402_CO]  235.28 155.95 90 bottom
C2P19  -  [CAP_0402_CO]  218.44 155.57 270 bottom
C2P20  -  [CAP_0402_CO]  233.68 155.57 270 bottom
C2P21  -  [CAP_0402_CO]  207.31 155.5 270 bottom
C2P22  -  [CAP_0402_CO]  239.34 155.44 270 bottom
C2P23  -  [CAP_0402_CO]  208.84 155.44 270 bottom
C2P24  -  [CAP_0402_CO]  224.08 155.44 270 bottom
C2P25  -  [CAP_0402_CO]  225.61 155.44 270 bottom
C2P26  -  [CAP_0402_CO]  240.86 155.32 270 bottom
C2R1  -  [CAP_0805_CO]  229.66 116.89 270 bottom
C2R2  -  [CAP_0805_CO]  227.76 116.89 270 bottom
C2R3  -  [CAP_0402_CO]  206.92 111.5 270 bottom
C2R4  -  [CAP_0402_CO]  208.92 111.5 90 bottom
C2R5  -  [CAP_0402_CO]  210.92 111.5 270 bottom
C2R6  -  [CAP_0402_CO]  212.92 111.5 90 bottom
C2R7  -  [CAP_0402_CO]  215 111.5 270 bottom
C2R8  -  [CAP_0402_CO]  217 111.5 90 bottom
C2R9  -  [CAP_0805_CO]  231.95 109.27 270 bottom
C2R10  -  [CAP_0805_CO]  234.11 109.27 270 bottom
C2R11  -  [CAP_0805_CO]  236.27 109.27 270 bottom
C2R12  -  [CAP_0805_CO]  238.43 109.27 270 bottom
C2R13  -  [CAP_0805_CO]  240.58 109.27 270 bottom
C2R14  -  [CAP_0402_CO]  219.5 109 0 bottom
C2R15  -  [CAP_0402_CO]  215 106.5 90 bottom
C2R16  -  [CAP_0805_CO]  225.47 105.46 90 bottom
C2R17  -  [CAP_0805_CO]  227.63 105.46 90 bottom
C2R18  -  [CAP_0805_CO]  229.79 105.46 90 bottom
C2R19  -  [CAP_0805_CO]  231.95 105.46 90 bottom
C2R20  -  [CAP_0805_CO]  234.11 105.46 90 bottom
C2R21  -  [CAP_0805_CO]  236.27 105.46 90 bottom
C2R22  -  [CAP_0805_CO]  238.43 105.46 90 bottom
C2R23  -  [CAP_0805_CO]  240.58 105.46 90 bottom
C2R24  -  [CAP_0805_CO]  206 103.5 270 bottom
C2R25  -  [CAP_0805_CO]  208 103.5 270 bottom
C2R26  -  [CAP_0805_CO]  210 103.5 270 bottom
C2R27  -  [CAP_0805_CO]  212 103.5 270 bottom
C2R28  -  [CAP_0805_CO]  214 103.5 270 bottom
C2R29  -  [CAP_0805_CO]  216 103.5 270 bottom
C2R30  -  [CAP_0805_CO]  218 103.5 270 bottom
C2R31  -  [CAP_0805_CO]  220 103.5 270 bottom
C2R32  -  [CAP_0805_CO]  222 103.5 270 bottom
C2R33  -  [CAP_0805_CO]  225.47 101.65 270 bottom
C2R34  -  [CAP_0805_CO]  227.63 101.65 270 bottom
C2R35  -  [CAP_0805_CO]  229.79 101.65 270 bottom
C2R36  -  [CAP_0805_CO]  231.95 101.65 270 bottom
C2R37  -  [CAP_0805_CO]  234.11 101.65 270 bottom
C2R38  -  [CAP_0805_CO]  236.27 101.65 270 bottom
C2R39  -  [CAP_0805_CO]  238.43 101.65 270 bottom
C2R40  -  [CAP_0805_CO]  240.58 101.65 270 bottom
C2R41  -  [CAP_0402_CO]  206.5 105.41 0 bottom
C2R42  -  [CAP_0402_CO]  210.49 105.41 0 bottom
C2T1  -  [CAP_0805_CO]  206 100.5 270 bottom
C2T2  -  [CAP_0805_CO]  208 100.5 270 bottom
C2T3  -  [CAP_0805_CO]  210 100.5 270 bottom
C2T4  -  [CAP_0805_CO]  212 100.5 270 bottom
C2T5  -  [CAP_0805_CO]  214 100.5 270 bottom
C2T6  -  [CAP_0805_CO]  216 100.5 270 bottom
C2T7  -  [CAP_0805_CO]  218 100.5 270 bottom
C2T8  -  [CAP_0805_CO]  220 100.5 270 bottom
C2T9  -  [CAP_0805_CO]  222 100.5 270 bottom
C2T10  -  [CAP_0805_CO]  225.47 97.84 90 bottom
C2T11  -  [CAP_0805_CO]  227.63 97.84 90 bottom
C2T12  -  [CAP_0805_CO]  229.79 97.84 90 bottom
C2T13  -  [CAP_0805_CO]  231.95 97.84 90 bottom
C2T14  -  [CAP_0805_CO]  234.11 97.84 90 bottom
C2T15  -  [CAP_0805_CO]  236.27 97.84 90 bottom
C2T16  -  [CAP_0805_CO]  238.43 97.84 90 bottom
C2T17  -  [CAP_0805_CO]  240.58 97.84 90 bottom
C2T18  -  [CAP_0805_CO]  210 97.5 270 bottom
C2T19  -  [CAP_0805_CO]  212 97.5 270 bottom
C2T20  -  [CAP_0805_CO]  214 97.5 270 bottom
C2T21  -  [CAP_0805_CO]  216 97.5 270 bottom
C2T22  -  [CAP_0805_CO]  218 97.5 270 bottom
C2T23  -  [CAP_0805_CO]  220 97.5 270 bottom
C2T24  -  [CAP_0805_CO]  222 97.5 270 bottom
C2T25  -  [CAP_0805_CO]  210 94.5 270 bottom
C2T26  -  [CAP_0805_CO]  212 94.5 270 bottom
C2T27  -  [CAP_0805_CO]  214 94.5 270 bottom
C2T28  -  [CAP_0805_CO]  216 94.5 270 bottom
C2T29  -  [CAP_0805_CO]  218 94.5 270 bottom
C2T30  -  [CAP_0805_CO]  220 94.5 270 bottom
C2T31  -  [CAP_0805_CO]  222 94.5 270 bottom
C2T32  -  [CAP_0805_CO]  225.47 94.03 270 bottom
C2T33  -  [CAP_0805_CO]  227.63 94.03 270 bottom
C2T34  -  [CAP_0805_CO]  229.79 94.03 270 bottom
C2T35  -  [CAP_0805_CO]  231.95 94.03 270 bottom
C2T36  -  [CAP_0805_CO]  234.11 94.03 270 bottom
C2T37  -  [CAP_0805_CO]  236.27 94.03 270 bottom
C2T38  -  [CAP_0805_CO]  238.43 94.03 270 bottom
C2T39  -  [CAP_0805_CO]  240.58 94.03 270 bottom
C2T40  -  [CAP_0805_CO]  212 91.5 270 bottom
C2T41  -  [CAP_0805_CO]  214 91.5 270 bottom
C2T42  -  [CAP_0805_CO]  216 91.5 270 bottom
C2T43  -  [CAP_0805_CO]  218 91.5 270 bottom
C2T44  -  [CAP_0805_CO]  220 91.5 270 bottom
C2T45  -  [CAP_0805_CO]  222 91.5 270 bottom
C2T46  -  [CAP_0805_CO]  225.47 89.58 90 bottom
C2T47  -  [CAP_0805_CO]  227.63 89.58 90 bottom
C2T48  -  [CAP_0805_CO]  229.79 89.58 90 bottom
C2T49  -  [CAP_0805_CO]  231.95 89.58 90 bottom
C2T50  -  [CAP_0805_CO]  234.11 89.58 90 bottom
C2T51  -  [CAP_0805_CO]  236.27 89.58 90 bottom
C2T52  -  [CAP_0805_CO]  238.43 89.58 90 bottom
C2T53  -  [CAP_0805_CO]  206 88.5 270 bottom
C2T54  -  [CAP_0805_CO]  208 88.5 270 bottom
C2T55  -  [CAP_0805_CO]  210 88.5 270 bottom
C2T56  -  [CAP_0805_CO]  212 88.5 270 bottom
C2T57  -  [CAP_0805_CO]  214 88.5 270 bottom
C2T58  -  [CAP_0805_CO]  216 88.5 270 bottom
C2T59  -  [CAP_0805_CO]  218 88.5 270 bottom
C2T60  -  [CAP_0805_CO]  220 88.5 270 bottom
C2T61  -  [CAP_0805_CO]  222 88.5 270 bottom
C2T62  -  [CAP_0805_CO]  227.5 85.77 270 bottom
C2T63  -  [CAP_0805_CO]  229.66 85.77 270 bottom
C2T64  -  [CAP_0805_CO]  231.82 85.77 270 bottom
C2T65  -  [CAP_0805_CO]  233.98 85.77 270 bottom
C2T66  -  [CAP_0805_CO]  236.27 85.77 270 bottom
C2T67  -  [CAP_0805_CO]  238.43 85.77 270 bottom
C2T68  -  [CAP_0805_CO]  222.13 85.5 270 bottom
C2T69  -  [CAP_0402_CO]  217.5 85 180 bottom
C2T70  -  [CAP_0805_CO]  231.82 81.96 90 bottom
C2T71  -  [CAP_0805_CO]  233.98 81.96 90 bottom
C2T72  -  [CAP_0805_CO]  236.27 81.96 90 bottom
C2T73  -  [CAP_0805_CO]  238.43 81.96 90 bottom
C2T74  -  [CAP_0402_CO]  206.92 80.5 90 bottom
C2T75  -  [CAP_0402_CO]  208.92 80.5 270 bottom
C2T76  -  [CAP_0402_CO]  210.92 80.5 90 bottom
C2T77  -  [CAP_0402_CO]  213.08 80.5 270 bottom
C2T78  -  [CAP_0402_CO]  214.92 80.5 90 bottom
C2T79  -  [CAP_0402_CO]  217 80.5 270 bottom
C2T80  -  [CAP_0805_CO]  238.43 78.15 270 bottom
C2T81  -  [CAP_0805_CO]  228.77 75.99 0 bottom
C2T82  -  [CAP_0805_CO]  228.77 74.09 0 bottom
C2T83  -  [CAP_0402_CO]  212.49 86.58 0 bottom
C2T84  -  [CAP_0402_CO]  208.48 86.58 0 bottom
C2U1  -  [CAP_0402_CO]  232.21 36.69 90 bottom
C2U2  -  [CAP_0402_CO]  216.97 36.56 90 bottom
C2U3  -  [CAP_0402_CO]  218.49 36.56 90 bottom
C2U4  -  [CAP_0402_CO]  233.73 36.56 90 bottom
C2U5  -  [CAP_0402_CO]  208.9 36.43 90 bottom
C2U6  -  [CAP_0402_CO]  224.14 36.43 90 bottom
C2U7  -  [CAP_0402_CO]  239.38 36.43 90 bottom
C2U8  -  [CAP_0402_CO]  207.32 36.06 270 bottom
C2U9  -  [CAP_0402_CO]  222.56 36.06 270 bottom
C2U10  -  [CAP_0402_CO]  237.8 36.06 270 bottom
C2U11  -  [CAP_0402_CO]  214.68 35.17 90 bottom
C2U12  -  [CAP_0402_CO]  229.92 35.17 90 bottom
C2U13  -  [CAP_0402_CO]  245.16 35.17 90 bottom
C2U14  -  [CAP_0402_CO]  218.49 34.53 270 bottom
C2U15  -  [CAP_0402_CO]  233.73 34.53 270 bottom
C2U16  -  [CAP_0402_CO]  208.98 34.02 270 bottom
C2U17  -  [CAP_0402_CO]  224.22 34.02 270 bottom
C2U18  -  [CAP_0402_CO]  239.46 34.02 270 bottom
C2U19  -  [CAP_0402_CO]  216.59 26.91 270 bottom
C2U20  -  [CAP_0402_CO]  231.83 26.91 270 bottom
C2U21  -  [CAP_0402_CO]  226.37 26.66 0 bottom
C2U22  -  [CAP_0402_CO]  241.61 26.66 0 bottom
C2U23  -  [CAP_0402_CO]  211.05 26.55 0 bottom
C3B1  -  [CAP_6P3X11_2P54MM]  37.51 191.82 90 top
C3B2  -  [CAP_0402_CO]  22.91 185.72 0 top
C3C1  -  [CAP_1206_3P2X1P6X1P8_3MM_CO]  22.78 180.64 270 top
C3C2  -  [CAP_0603_CO]  37.72 172.41 0 top
C3C3  -  [CAP_0805_CO]  27.73 168.96 270 top
C3C4  -  [CAP_0402_CO]  29.64 168.96 270 top
C3C5  -  [CAP_0402_CO]  38.66 165.91 0 top
C3C6  -  [CAP_0402_CO]  34.08 165.78 0 top
C3C7  -  [CAP_0402_CO]  37 165.27 270 top
C3C8  -  [CAP_0402_CO]  33.45 163.88 270 top
C3C9  -  [CAP_0603_CO]  34.84 143.94 90 top
C3C11  -  [CAP_0805_CO]  25.7 168.96 270 top
C3C15  -  [CAP_0805_CO]  17.83 161.46 90 top
C3C16  -  [CAP_0805_CO]  19.86 161.46 90 top
C3C17  -  [CAP_0402_CO]  27.61 154.23 180 top
C3C18  -  [CAP_0603_CO]  30.27 153.97 270 top
C3C19  -  [CAP_0402_CO]  27.61 151.94 0 top
C3C21  -  [CAP_0805_CO]  39.42 153.08 0 top
C3C22  -  [CAP_0805_CO]  39.42 151.18 0 top
C3C23  -  [CAP_0805_CO]  39.42 149.27 0 top
C3C25  -  [CAP_0402_CO]  11.48 182.42 90 top
C3C26  -  [CAP_0402_CO]  11.48 179.88 270 top
C3D1  -  [CAP_0805_CO]  12.49 115.24 90 top
C3D2  -  [CAP_0805_CO]  14.53 115.24 90 top
C3D3  -  [CAP_0805_CO]  16.56 115.24 90 top
C3D4  -  [CAP_0603_CO]  10.21 106.73 90 top
C3D5  -  [CAP_0402_CO]  32.3 140.89 90 top
C3D6  -  [CAP_0402_CO]  33.58 140.89 90 top
C3D8  -  [CAP_0402_CO]  32.81 132.76 90 top
C3D9  -  [CAP_0402_CO]  32.81 126.54 90 top
C3D17  -  [CAP_0402_CO]  28.62 106.73 90 top
C3D20  -  [CAP_0402_CO]  22.65 145.72 90 bottom
C3D21  -  [CAP_0805_CO]  37.13 141.02 90 top
C3D22  -  [CAP_0805_CO]  39.04 141.02 90 top
C3D23  -  [CAP_0805_CO]  40.94 141.02 90 top
C3E1  -  [CAP_0402_CO]  9.7 101.14 180 top
C3E2  -  [CAP_0402_CO]  23.54 84.76 0 top
C3E3  -  [CAP_0402_CO]  9.06 98.22 90 top
C3E4  -  [CAP_0402_CO]  15.92 100.12 90 top
C3E8  -  [CAP_0805_CO]  17.06 95.04 0 top
C3E9  -  [CAP_0805_CO]  17.06 91.99 0 top
C3E10  -  [CAP_0805_CO]  17.06 88.95 0 top
C3E12  -  [CAP_0805_CO]  40.18 81.07 90 top
C3E13  -  [CAP_0603_CO]  23.41 80.56 180 top
C3E14  -  [CAP_0603_CO]  30.91 79.42 270 top
C3E15  -  [CAP_8P5X9_3P5MM]  14.14 82.22 0 top
C3E16  -  [CAP_0603_CO]  24.3 78.03 180 top
C3E17  -  [CAP_0402_CO]  33.96 69.26 0 top
C3F1  -  [CAP_6P3X11_2P54MM]  16.18 43.48 90 top
C3F2  -  [CAP_0402_CO]  11.86 39.67 90 top
C3F3  -  [CAP_0603_CO]  11.86 41.96 270 top
C3F4  -  [CAP_0402_CO]  20.62 35.84 180 top
C3F5  -  [CAP_0402_CO]  20.62 34.87 180 top
C3P1  -  [CAP_0402_CO]  201.05 165.45 180 bottom
C3P2  -  [CAP_0402_CO]  177.14 165.44 180 bottom
C3P3  -  [CAP_0402_CO]  171.38 165.09 90 bottom
C3P4  -  [CAP_0402_CO]  186.62 165.09 90 bottom
C3P5  -  [CAP_0402_CO]  178.98 157.98 90 bottom
C3P6  -  [CAP_0402_CO]  203.11 157.98 90 bottom
C3P7  -  [CAP_0402_CO]  169.47 157.47 90 bottom
C3P8  -  [CAP_0402_CO]  184.71 157.47 90 bottom
C3P9  -  [CAP_0402_CO]  173.28 156.71 270 bottom
C3P10  -  [CAP_0402_CO]  188.32 156.71 270 bottom
C3P11  -  [CAP_0402_CO]  165.41 155.94 90 bottom
C3P12  -  [CAP_0402_CO]  180.65 155.94 90 bottom
C3P13  -  [CAP_0402_CO]  204.78 155.94 90 bottom
C3P14  -  [CAP_0402_CO]  179.07 155.57 270 bottom
C3P15  -  [CAP_0402_CO]  203.2 155.57 270 bottom
C3P16  -  [CAP_0402_CO]  168.15 155.49 270 bottom
C3P17  -  [CAP_0402_CO]  183.39 155.49 270 bottom
C3P18  -  [CAP_0402_CO]  169.47 155.44 270 bottom
C3P19  -  [CAP_0402_CO]  184.71 155.44 270 bottom
C3R2  -  [CAP_0805_CO]  181.02 120.57 90 bottom
C3R3  -  [CAP_0805_CO]  185.21 118.41 0 bottom
C3R4  -  [CAP_0402_CO]  187 112 0 bottom
C3R5  -  [CAP_0402_CO]  190.92 111.5 270 bottom
C3R6  -  [CAP_0402_CO]  192.92 111.5 90 bottom
C3R7  -  [CAP_0402_CO]  194.92 111.5 270 bottom
C3R8  -  [CAP_0402_CO]  196.92 111.5 90 bottom
C3R9  -  [CAP_0402_CO]  198.92 111.5 270 bottom
C3R10  -  [CAP_0402_CO]  200.92 111.5 90 bottom
C3R11  -  [CAP_0402_CO]  202.92 111.5 270 bottom
C3R12  -  [CAP_0402_CO]  204.92 111.5 90 bottom
C3R13  -  [CAP_0402_CO]  187 110.13 0 bottom
C3R14  -  [CAP_0402_CO]  187 108 180 bottom
C3R15  -  [CAP_0402_CO]  193.75 105.1 180 bottom
C3R16  -  [CAP_0805_CO]  198 103.5 270 bottom
C3R17  -  [CAP_0805_CO]  200 103.5 270 bottom
C3R18  -  [CAP_0805_CO]  202 103.5 270 bottom
C3R19  -  [CAP_0805_CO]  204 103.5 270 bottom
C3R20  -  [CAP_0402_CO]  194.79 103.42 270 bottom
C3R21  -  [CAP_0402_CO]  191.61 103.3 180 bottom
C3R22  -  [CAP_0402_CO]  191.72 102.03 180 bottom
C3R24  -  [CAP_0402_CO]  193.5 101.5 270 bottom
C3R25  -  [CAP_0402_CO]  180.64 103.04 0 bottom
C3R26  -  [CAP_0402_CO]  180.64 102.03 0 bottom
C3R27  -  [CAP_0402_CO]  198.5 105.41 0 bottom
C3R28  -  [CAP_0402_CO]  202.48 105.41 0 bottom
C3T1  -  [CAP_0603_CO]  198.17 95.53 90 bottom
C3T2  -  [CAP_0402_CO]  192.5 100.5 90 bottom
C3T3  -  [CAP_0805_CO]  198 100.5 270 bottom
C3T4  -  [CAP_0805_CO]  200 100.5 270 bottom
C3T5  -  [CAP_0603_CO]  192.83 97.49 90 bottom
C3T6  -  [CAP_0603_CO]  198.22 91.49 270 bottom
C3T7  -  [CAP_0402_CO]  196 99.5 270 bottom
C3T8  -  [CAP_0402_CO]  194.5 98.5 0 bottom
C3T11  -  [CAP_0402_CO]  194.5 97.5 0 bottom
C3T12  -  [CAP_0402_CO]  196.5 97.5 0 bottom
C3T15  -  [CAP_0402_CO]  194.5 96.5 0 bottom
C3T16  -  [CAP_0402_CO]  196.5 96.5 0 bottom
C3T19  -  [CAP_0402_CO]  194.5 94.5 180 bottom
C3T20  -  [CAP_0402_CO]  194.5 93.5 180 bottom
C3T21  -  [CAP_0402_CO]  196.5 93.5 180 bottom
C3T22  -  [CAP_0402_CO]  194.5 92.5 180 bottom
C3T23  -  [CAP_0402_CO]  196.5 92.5 180 bottom
C3T24  -  [CAP_0402_CO]  193.5 91.5 0 bottom
C3T25  -  [CAP_0402_CO]  193.5 90.5 0 bottom
C3T26  -  [CAP_0402_CO]  195.5 90.5 0 bottom
C3T27  -  [CAP_0402_CO]  198.5 87.5 270 bottom
C3T28  -  [CAP_0402_CO]  193.5 89.5 0 bottom
C3T29  -  [CAP_0402_CO]  195.5 89.5 0 bottom
C3T30  -  [CAP_0402_CO]  193.5 88.5 0 bottom
C3T31  -  [CAP_0402_CO]  195.5 88.5 0 bottom
C3T32  -  [CAP_0805_CO]  200 88.5 270 bottom
C3T33  -  [CAP_0805_CO]  202 88.5 270 bottom
C3T34  -  [CAP_0805_CO]  204 88.5 270 bottom
C3T35  -  [CAP_0402_CO]  193.5 87.5 0 bottom
C3T36  -  [CAP_0402_CO]  195.5 87.5 0 bottom
C3T37  -  [CAP_0402_CO]  180.64 89.33 180 bottom
C3T38  -  [CAP_0402_CO]  187.5 84.25 0 bottom
C3T39  -  [CAP_0402_CO]  187 82 0 bottom
C3T40  -  [CAP_0402_CO]  184.96 80.06 270 bottom
C3T41  -  [CAP_0402_CO]  190.87 80.5 90 bottom
C3T42  -  [CAP_0402_CO]  192.92 80.5 270 bottom
C3T43  -  [CAP_0402_CO]  194.92 80.5 90 bottom
C3T44  -  [CAP_0402_CO]  196.92 80.5 270 bottom
C3T45  -  [CAP_0402_CO]  198.92 80.5 90 bottom
C3T46  -  [CAP_0402_CO]  200.92 80.5 270 bottom
C3T47  -  [CAP_0402_CO]  202.92 80.5 90 bottom
C3T48  -  [CAP_0402_CO]  204.92 80.5 270 bottom
C3T49  -  [CAP_0402_CO]  186.82 80.13 0 bottom
C3T50  -  [CAP_0402_CO]  189.5 78.25 180 bottom
C3T51  -  [CAP_0805_CO]  179.62 74.47 180 bottom
C3T52  -  [CAP_0805_CO]  179.62 72.56 180 bottom
C3T53  -  [CAP_0402_CO]  196.5 94.5 180 bottom
C3T54  -  [CAP_0402_CO]  200.48 86.58 0 bottom
C3T55  -  [CAP_0402_CO]  204.49 86.58 0 bottom
C3T56  -  [CAP_0603_CO]  191.44 97.51 90 bottom
C3T57  -  [CAP_0603_CO]  199.56 91.49 270 bottom
C3U1  -  [CAP_0402_CO]  179.12 36.56 90 bottom
C3U2  -  [CAP_0402_CO]  203.25 36.56 90 bottom
C3U3  -  [CAP_0402_CO]  165.2 36.51 90 bottom
C3U4  -  [CAP_0402_CO]  180.64 36.5 90 bottom
C3U5  -  [CAP_0402_CO]  204.7 36.51 90 bottom
C3U6  -  [CAP_0402_CO]  169.53 36.43 90 bottom
C3U7  -  [CAP_0402_CO]  184.77 36.43 90 bottom
C3U8  -  [CAP_0402_CO]  167.95 36.06 270 bottom
C3U9  -  [CAP_0402_CO]  183.19 36.06 270 bottom
C3U10  -  [CAP_0402_CO]  175.31 35.17 90 bottom
C3U11  -  [CAP_0402_CO]  199.44 35.17 90 bottom
C3U12  -  [CAP_0402_CO]  179.12 34.53 270 bottom
C3U13  -  [CAP_0402_CO]  203.25 34.53 270 bottom
C3U14  -  [CAP_0402_CO]  169.61 34.02 270 bottom
C3U15  -  [CAP_0402_CO]  184.85 34.02 270 bottom
C3U16  -  [CAP_0402_CO]  177.22 26.91 270 bottom
C3U17  -  [CAP_0402_CO]  201.35 26.78 270 bottom
C3U18  -  [CAP_0402_CO]  171.45 26.56 0 bottom
C3U19  -  [CAP_0402_CO]  186.69 26.56 0 bottom
C4B1  -  [CAP_0402_CO]  56.82 194.1 0 top
C4B2  -  [CAP_0402_CO]  53.92 190.29 0 top
C4B3  -  [CAP_1206_3P2X1P6X1P8_3MM_CO]  51.48 187.12 270 top
C4B4  -  [CAP_6P3X11_2P54MM]  55.19 185.98 90 top
C4B5  -  [CAP_0603_CO]  79.93 212.26 90 top
C4B6  -  [CAP_0603_CO]  81.33 212.26 90 top
C4B7  -  [CAP_0402_CO]  73.2 195.25 90 top
C4B8  -  [CAP_0402_CO]  74.47 195.25 90 top
C4B9  -  [CAP_0805_CO]  42.85 219.12 0 top
C4B10  -  [CAP_0402_CO]  42.85 217.47 0 top
C4B11  -  [CAP_0603_CO]  57.07 196.9 0 top
C4B12  -  [CAP_0805_CO]  46.15 187.37 270 top
C4B13  -  [CAP_0805_CO]  48.18 187.37 270 top
C4C3  -  [CAP_0603_CO]  81.33 177.21 90 top
C4C4  -  [CAP_0402_CO]  79.04 176.58 180 top
C4C5  -  [CAP_0805_CO]  54.78 174.42 0 top
C4C6  -  [CAP_0805_CO]  54.78 172.51 0 top
C4C7  -  [CAP_0603_CO]  79.04 170.74 180 top
C4C8  -  [CAP_0805_CO]  54.78 170.61 0 top
C4C9  -  [CAP_0805_CO]  79.68 168.96 180 top
C4C10  -  [CAP_0805_CO]  79.68 166.93 180 top
C4C11  -  [CAP_0603_CO]  79.68 165.15 180 top
C4C17  -  [CAP_0402_CO]  72.18 153.08 90 top
C4C18  -  [CAP_0402_CO]  73.71 153.08 90 top
C4C19  -  [CAP_0402_CO]  75.36 153.08 90 top
C4C20  -  [CAP_0402_CO]  76.88 153.08 90 top
C4D1  -  [CAP_0402_CO]  79.17 111.68 270 top
C4D2  -  [CAP_0402_CO]  80.44 111.68 270 top
C4D3  -  [CAP_0402_CO]  50.09 116.63 180 top
C4E1  -  [CAP_0402_CO]  82.6 92.88 90 top
C4E2  -  [CAP_0402_CO]  72.56 92.88 90 top
C4E4  -  [CAP_0805_CO]  42.97 81.07 90 top
C4E10  -  [CAP_1206_3P2X1P6X1P8_3MM_CO]  58.59 60.5 180 top
C4E11  -  [CAP_1206_3P2X1P6X1P8_3MM_CO]  58.59 63.04 180 top
C4E13  -  [CAP_0805_CO]  74.85 62.02 90 top
C4E14  -  [CAP_0805_CO]  72.31 62.02 90 top
C4F2  -  [CAP_1206_3P2X1P6X1P8_3MM_CO]  58.59 57.96 180 top
C4F3  -  [CAP_0603_CO]  57.32 56.05 180 top
C4F4  -  [CAP_0603_CO]  48.81 52.5 180 top
C4F5  -  [CAP_0603_CO]  61.01 52.5 270 top
C4F6  -  [CAP_0402_CO]  48.81 49.96 180 top
C4F7  -  [CAP_0805_CO]  77.26 45.89 270 top
C4F8  -  [CAP_0805_CO]  79.3 45.89 270 top
C4F10  -  [CAP_0402_CO]  60.88 37.38 180 top
C4F11  -  [CAP_0402_CO]  66.47 37.38 0 top
C4F12  -  [CAP_0805_CO]  77.26 34.21 0 top
C4F13  -  [CAP_0805_CO]  77.26 32.3 0 top
C4F14  -  [CAP_0402_CO]  61.26 31.8 270 top
C4F15  -  [CAP_0805_CO]  57.45 31.54 270 top
C4F16  -  [CAP_0805_CO]  59.48 31.54 270 top
C4F17  -  [CAP_0805_CO]  77.26 30.4 0 top
C4F18  -  [CAP_0402_CO]  62.79 20.75 90 top
C4F19  -  [CAP_0402_CO]  43.23 16.18 180 top
C4F21  -  [CAP_6P3X9P5_2P5MM]  77.14 53.89 90 top
C4N1  -  [CAP_0402_CO]  159.18 221.92 180 bottom
C4P2  -  [CAP_0402_CO]  161.9 165.44 180 bottom
C4P4  -  [CAP_0402_CO]  163.74 157.98 90 bottom
C4P5  -  [CAP_0402_CO]  163.83 155.57 270 bottom
C4R1  -  [CAP_0402_CO]  154.87 135.12 0 bottom
C4R2  -  [CAP_0402_CO]  146.61 133.21 180 bottom
C4R3  -  [CAP_0402_CO]  156.26 132.83 0 bottom
C4R4  -  [CAP_0402_CO]  154.23 131.31 180 bottom
C4R5  -  [CAP_0402_CO]  156.26 131.31 0 bottom
C4R6  -  [CAP_0805_CO]  133.78 127.81 270 bottom
C4R7  -  [CAP_0402_CO]  155.76 127.24 180 bottom
C4R8  -  [CAP_0402_CO]  156.13 125.66 0 bottom
C4R9  -  [CAP_0402_CO]  133.65 125.65 0 bottom
C4R10  -  [CAP_0402_CO]  153.72 125.58 180 bottom
C4R11  -  [CAP_0402_CO]  146.26 123.74 270 bottom
C4R12  -  [CAP_0402_CO]  132 122.86 90 bottom
C4R13  -  [CAP_0402_CO]  135.68 121.2 180 bottom
C4R14  -  [CAP_0402_CO]  154.99 119.88 0 bottom
C4R15  -  [CAP_0402_CO]  135.43 118.54 180 bottom
C4R16  -  [CAP_0402_CO]  146.61 117.97 180 bottom
C4R17  -  [CAP_0402_CO]  156.26 117.59 0 bottom
C4R18  -  [CAP_0402_CO]  154.23 116.07 180 bottom
C4R19  -  [CAP_0402_CO]  156.26 116.07 0 bottom
C4R20  -  [CAP_0805_CO]  134.92 116 180 bottom
C4R21  -  [CAP_0402_CO]  160.19 113.46 0 bottom
C4R22  -  [CAP_0402_CO]  135.43 112.82 180 bottom
C4R23  -  [CAP_0402_CO]  155.76 112 180 bottom
C4R24  -  [CAP_0402_CO]  156.13 110.42 0 bottom
C4R25  -  [CAP_0402_CO]  153.72 110.34 180 bottom
C4R26  -  [CAP_0805_CO]  134.79 109.65 180 bottom
C4R27  -  [CAP_0402_CO]  146.74 107.18 270 bottom
C4R28  -  [CAP_0402_CO]  135.56 106.47 180 bottom
C4R29  -  [CAP_0402_CO]  143.82 106.16 270 bottom
C4R30  -  [CAP_0805_CO]  156.64 105.58 0 bottom
C4R31  -  [CAP_0805_CO]  147.75 104.82 180 bottom
C4R32  -  [CAP_0402_CO]  153.84 104.69 270 bottom
C4T1  -  [CAP_0402_CO]  153.34 85.84 90 bottom
C4T2  -  [CAP_0402_CO]  146.87 83.43 180 bottom
C4T3  -  [CAP_0402_CO]  156.26 83.05 0 bottom
C4T4  -  [CAP_0402_CO]  154.23 81.52 180 bottom
C4T5  -  [CAP_0402_CO]  156.26 81.52 0 bottom
C4T6  -  [CAP_0402_CO]  161.06 79.04 0 bottom
C4T7  -  [CAP_0402_CO]  155.76 77.46 180 bottom
C4T8  -  [CAP_0402_CO]  156.13 75.88 0 bottom
C4T9  -  [CAP_0402_CO]  153.72 75.79 180 bottom
C4T10  -  [CAP_0402_CO]  146.26 73.95 270 bottom
C4T11  -  [CAP_0402_CO]  154.99 70.09 0 bottom
C4T12  -  [CAP_0402_CO]  146.61 68.19 180 bottom
C4T13  -  [CAP_0402_CO]  156.26 67.81 0 bottom
C4T14  -  [CAP_0402_CO]  154.23 66.28 180 bottom
C4T15  -  [CAP_0402_CO]  156.26 66.28 0 bottom
C4T16  -  [CAP_0402_CO]  155.76 62.22 180 bottom
C4T17  -  [CAP_0402_CO]  156.13 60.64 0 bottom
C4T18  -  [CAP_0402_CO]  153.72 60.55 180 bottom
C4T19  -  [CAP_0805_CO]  128.06 83.74 90 bottom
C4T20  -  [CAP_0805_CO]  125.78 83.74 90 bottom
C4U3  -  [CAP_0402_CO]  146.26 58.71 270 bottom
C4U6  -  [CAP_0805_CO]  130.6 56.31 90 top
C4U7  -  [CAP_0805_CO]  132.63 56.31 90 top
C4U8  -  [CAP_0805_CO]  134.67 56.31 90 top
C4U9  -  [CAP_0402_CO]  163.88 36.56 90 bottom
C4U10  -  [CAP_0402_CO]  160.07 35.17 90 bottom
C4U11  -  [CAP_0402_CO]  163.88 34.53 270 bottom
C4U12  -  [CAP_0402_CO]  161.98 26.78 270 bottom
C5A1  -  [CAP_0402_CO]  109.52 228.9 180 top
C5A2  -  [CAP_0805_CO]  118.16 225.85 0 top
C5A3  -  [CAP_0402_CO]  114.85 227.63 0 top
C5B1  -  [CAP_0402_CO]  111.81 221.15 270 top
C5B2  -  [CAP_0402_CO]  96.82 221.53 270 top
C5B3  -  [CAP_0402_CO]  115.87 214.68 90 top
C5B4  -  [CAP_0402_CO]  106.6 213.53 90 top
C5B5  -  [CAP_0402_CO]  106.6 211.25 270 top
C5B6  -  [CAP_0402_CO]  88.69 208.45 0 top
C5B7  -  [CAP_0805_CO]  108.12 208.2 0 top
C5B8  -  [CAP_0402_CO]  88.69 207.18 0 top
C5B9  -  [CAP_0402_CO]  108.12 206.68 0 top
C5B11  -  [CAP_0603_CO]  109.52 223.82 0 top
C5B13  -  [CAP_0402_CO]  119.55 218.11 270 bottom
C5C1  -  [CAP_6P3X11_2P54MM]  86.53 179.88 0 top
C5C2  -  [CAP_0402_CO]  85.52 173.53 270 top
C5C3  -  [CAP_0805_CO]  83.87 173.15 90 top
C5C4  -  [CAP_0805_CO]  112.06 169.97 270 top
C5C5  -  [CAP_0805_CO]  114.22 169.97 270 top
C5C6  -  [CAP_0402_CO]  95.68 169.47 90 top
C5C7  -  [CAP_0402_CO]  97.2 169.47 90 top
C5C8  -  [CAP_0402_CO]  98.73 169.47 90 top
C5C9  -  [CAP_0402_CO]  100.25 169.47 90 top
C5C10  -  [CAP_0603_CO]  121.84 168.58 90 top
C5C11  -  [CAP_0805_CO]  87.42 167.18 180 top
C5C12  -  [CAP_0805_CO]  93.01 167.18 0 top
C5C13  -  [CAP_0603_CO]  92.76 165.53 180 top
C5C14  -  [CAP_0603_CO]  87.17 165.53 0 top
C5C16  -  [CAP_0402_CO]  87.17 173.91 180 top
C5C17  -  [CAP_0402_CO]  88.69 156.77 270 top
C5C18  -  [CAP_0402_CO]  109.52 156.77 90 top
C5C19  -  [CAP_0402_CO]  105.2 152.83 180 top
C5C20  -  [CAP_0402_CO]  105.2 151.69 180 top
C5C21  -  [CAP_0603_CO]  104.95 150.42 180 top
C5C23  -  [CAP_0402_CO]  110.79 144.06 270 top
C5C24  -  [CAP_0402_CO]  97.33 165.53 0 top
C5C25  -  [CAP_0402_CO]  91.11 174.29 90 top
C5D3  -  [CAP_0402_CO]  88.19 134.79 0 top
C5D4  -  [CAP_0402_CO]  88.19 133.78 0 top
C5D5  -  [CAP_0402_CO]  94.41 133.4 0 top
C5D6  -  [CAP_0402_CO]  94.41 131.87 0 top
C5D7  -  [CAP_0402_CO]  89.33 131.62 0 top
C5D8  -  [CAP_0402_CO]  89.33 130.09 0 top
C5D9  -  [CAP_0402_CO]  88.19 118.54 0 top
C5D10  -  [CAP_0402_CO]  94.92 121.08 270 top
C5D11  -  [CAP_0402_CO]  94.92 123.24 90 top
C5D12  -  [CAP_0402_CO]  88.19 117.52 0 top
C5E1  -  [CAP_0402_CO]  111.81 101.01 90 top
C5E14  -  [CAP_0603_CO]  108.38 82.98 90 top
C5E15  -  [CAP_0402_CO]  112.57 81.83 0 top
C5E17  -  [CAP_0402_CO]  114.47 81.83 90 top
C5E18  -  [CAP_0402_CO]  111.93 79.55 270 top
C5E19  -  [CAP_0402_CO]  103.04 78.41 90 top
C5E20  -  [CAP_0402_CO]  113.46 76.63 90 top
C5E21  -  [CAP_0805_CO]  97.2 75.74 90 top
C5E22  -  [CAP_0805_CO]  100 75.74 90 top
C5E23  -  [CAP_0603_CO]  106.6 74.6 180 top
C5E25  -  [CAP_0603_CO]  100.63 61.77 270 top
C5F1  -  [CAP_0805_CO]  123.49 83.74 90 top
C5F4  -  [CAP_0805_CO]  102.41 49.83 180 top
C5F5  -  [CAP_0603_CO]  110.79 47.55 270 top
C5F6  -  [CAP_0402_CO]  105.08 47.16 270 top
C5F7  -  [CAP_0805_CO]  94.03 34.72 270 top
C5F8  -  [CAP_0805_CO]  96.06 34.72 270 top
C5F9  -  [CAP_0603_CO]  98.6 34.34 270 top
C5F10  -  [CAP_6P3X7_2P5MM]  100.38 19.48 90 top
C5F11  -  [CAP_6P3X7_2P5MM]  120.7 19.48 90 top
C5F12  -  [CAP_0402_CO]  116.25 16.68 180 top
C5F13  -  [CAP_0805_CO]  122.47 56.31 90 top
C5F14  -  [CAP_0805_CO]  120.44 56.31 90 top
C5F15  -  [CAP_0402_CO]  105.46 13.38 0 top
C5N1  -  [CAP_0402_CO]  104.44 214.17 0 bottom
C5N2  -  [CAP_0402_CO]  94.79 212.9 270 bottom
C5N3  -  [CAP_0402_CO]  95.93 212.9 270 bottom
C5N4  -  [CAP_0402_CO]  97.07 212.9 270 bottom
C5N5  -  [CAP_0402_CO]  98.22 212.9 270 bottom
C5N6  -  [CAP_0402_CO]  99.62 212.9 90 bottom
C5N7  -  [CAP_0402_CO]  93.65 212.01 270 bottom
C5N8  -  [CAP_0402_CO]  99.36 211.25 180 bottom
C5N9  -  [CAP_0402_CO]  103.93 211.12 270 bottom
C5N10  -  [CAP_0402_CO]  99.36 210.11 180 bottom
C5N11  -  [CAP_0402_CO]  93.65 209.85 90 bottom
C5N12  -  [CAP_0402_CO]  99.36 208.96 180 bottom
C5N13  -  [CAP_0402_CO]  99.36 207.82 180 bottom
C5N14  -  [CAP_0402_CO]  96.95 207.69 90 bottom
C5N15  -  [CAP_0402_CO]  99.36 205.28 270 bottom
C5N16  -  [CAP_0402_CO]  96.95 204.64 0 bottom
C5N17  -  [CAP_0805_CO]  96.95 203.12 0 bottom
C5P1  -  [CAP_0805_CO]  112.06 169.97 270 bottom
C5P2  -  [CAP_0805_CO]  114.22 169.97 270 bottom
C5P3  -  [CAP_0402_CO]  89.2 169.34 180 bottom
C5P4  -  [CAP_0402_CO]  91.49 169.34 0 bottom
C5R1  -  [CAP_0402_CO]  85.08 136.97 270 bottom
C5R2  -  [CAP_0603_CO]  88.08 134.47 0 bottom
C5R3  -  [CAP_0603_CO]  85.33 129.22 0 bottom
C5R4  -  [CAP_0603_CO]  90.83 132.97 0 bottom
C5R5  -  [CAP_0603_CO]  88.57 126.92 0 bottom
C5R6  -  [CAP_0603_CO]  85.9 141.65 0 bottom
C5R7  -  [CAP_0603_CO]  88.69 140.25 0 bottom
C5R8  -  [CAP_0603_CO]  88.08 137.47 0 bottom
C5R9  -  [CAP_0603_CO]  90.83 135.97 0 bottom
C5R10  -  [CAP_0603_CO]  84.83 126.22 0 bottom
C5R11  -  [CAP_0603_CO]  88.59 124.72 0 bottom
C5R12  -  [CAP_0402_CO]  94.92 118.41 90 bottom
C5R13  -  [CAP_0603_CO]  88.08 116.38 0 bottom
C5R14  -  [CAP_0603_CO]  85.9 138.86 0 bottom
C5R15  -  [CAP_0603_CO]  93.52 120.57 270 bottom
C5T1  -  [CAP_0805_CO]  123.49 83.74 90 bottom
C5T2  -  [CAP_0805_CO]  121.21 83.74 90 bottom
C5T3  -  [CAP_0805_CO]  118.92 83.74 90 bottom
C5T4  -  [CAP_0402_CO]  109.78 97.46 180 bottom
C5T6  -  [CAP_0402_CO]  111.93 89.58 270 bottom
C5T9  -  [CAP_0805_CO]  97.2 75.74 90 bottom
C5T10  -  [CAP_0805_CO]  100 75.74 90 bottom
C5T12  -  [CAP_0603_CO]  110.66 69.52 270 top
C5U3  -  [CAP_0805_CO]  94.03 34.72 270 bottom
C5U4  -  [CAP_0805_CO]  96.06 34.72 270 bottom
C5U5  -  [CAP_0805_CO]  118.92 83.74 90 top
C5U6  -  [CAP_0805_CO]  121.21 83.74 90 top
C5U7  -  [CAP_0805_CO]  118.41 56.31 90 top
C5U8  -  [CAP_0805_CO]  116.38 56.31 90 top
C5U9  -  [CAP_0402_CO]  89.2 30.91 0 bottom
C5U10  -  [CAP_0402_CO]  87.04 29.51 270 bottom
C6A1  -  [CAP_0402_CO]  125.65 230.81 90 top
C6A2  -  [CAP_0402_CO]  117.65 227.63 180 top
C6B1  -  [CAP_0402_CO]  145.08 215.44 180 top
C6B2  -  [CAP_0603_CO]  157.15 224.08 180 top
C6B3  -  [CAP_0805_CO]  160.96 224.08 0 top
C6B4  -  [CAP_0603_CO]  145.34 213.92 180 top
C6B5  -  [CAP_6P3X11_2P54MM]  140.51 220.9 90 top
C6B6  -  [CAP_0402_CO]  138.99 208.84 270 top
C6B8  -  [CAP_0402_CO]  152.22 212.39 90 top
C6B9  -  [CAP_0402_CO]  153.18 212.39 90 top
C6B10  -  [CAP_0805_CO]  139.75 185.72 90 top
C6C2  -  [CAP_0603_CO]  125.52 173.53 270 top
C6C3  -  [CAP_0402_CO]  162.23 169.91 90 top
C6C4  -  [CAP_0805_CO]  129.46 167.43 0 top
C6C5  -  [CAP_0402_CO]  132 153.59 0 top
C6C6  -  [CAP_0402_CO]  127.05 150.42 180 top
C6C7  -  [CAP_0402_CO]  133.14 149.53 0 top
C6C8  -  [CAP_0402_CO]  133.14 148.26 0 top
C6C9  -  [CAP_0805_CO]  135.94 147.37 180 top
C6C10  -  [CAP_0402_CO]  131.62 143.18 270 top
C6C13  -  [CAP_0603_CO]  126.16 171.5 180 top
C6C14  -  [CAP_8X8_3P5MM]  144.95 176.58 0 top
C6D1  -  [CAP_0603_CO]  129.71 141.14 180 top
C6D2  -  [CAP_0603_CO]  134.29 136.19 180 top
C6D3  -  [CAP_0402_CO]  130.98 135.56 90 top
C6D4  -  [CAP_0402_CO]  132.25 135.56 90 top
C6D5  -  [CAP_0402_CO]  125.14 133.65 270 top
C6D6  -  [CAP_0402_CO]  129.84 131.11 180 top
C6D7  -  [CAP_0805_CO]  141.4 129.08 270 top
C6D8  -  [CAP_0402_CO]  141.91 124.19 180 top
C6D10  -  [CAP_0603_CO]  160.57 103.3 180 top
C6D11  -  [CAP_0402_CO]  136.57 142.03 270 top
C6E1  -  [CAP_0402_CO]  128.06 93.39 90 top
C6E2  -  [CAP_0402_CO]  128.06 90.22 270 top
C6E3  -  [CAP_0805_CO]  156.51 87.93 0 top
C6E4  -  [CAP_0402_CO]  137.72 86.15 180 top
C6E5  -  [CAP_0805_CO]  137.72 84.25 180 top
C6E7  -  [CAP_0402_CO]  137.72 82.34 180 top
C6E8  -  [CAP_0805_CO]  137.72 80.44 180 top
C6E9  -  [CAP_0402_CO]  137.72 78.53 180 top
C6E10  -  [CAP_0805_CO]  137.72 76.63 180 top
C6E11  -  [CAP_0402_CO]  137.72 75.1 180 top
C6E12  -  [CAP_0402_CO]  137.72 72.06 180 top
C6E13  -  [CAP_0402_CO]  134.92 70.53 270 top
C6E14  -  [CAP_0402_CO]  141.91 70.47 180 top
C6E15  -  [CAP_8X8_3P5MM]  125.01 76.88 0 top
C6E16  -  [CAP_0402_CO]  136.57 67.74 0 top
C6E17  -  [CAP_0805_CO]  136.06 66.09 0 top
C6E18  -  [CAP_0805_CO]  141.65 63.42 90 top
C6F1  -  [CAP_0805_CO]  125.78 83.74 90 top
